# Altium PCB TimerDesign.PcbDoc
Units mm, origin at the board's own origin, x right, y up, seen from the top; angles counter-clockwise.
Board outline 152.4 x 101.6 mm, 2 copper layers (Top Layer, Bottom Layer); 29 components, 36 nets, 114 pads, 6 vias.
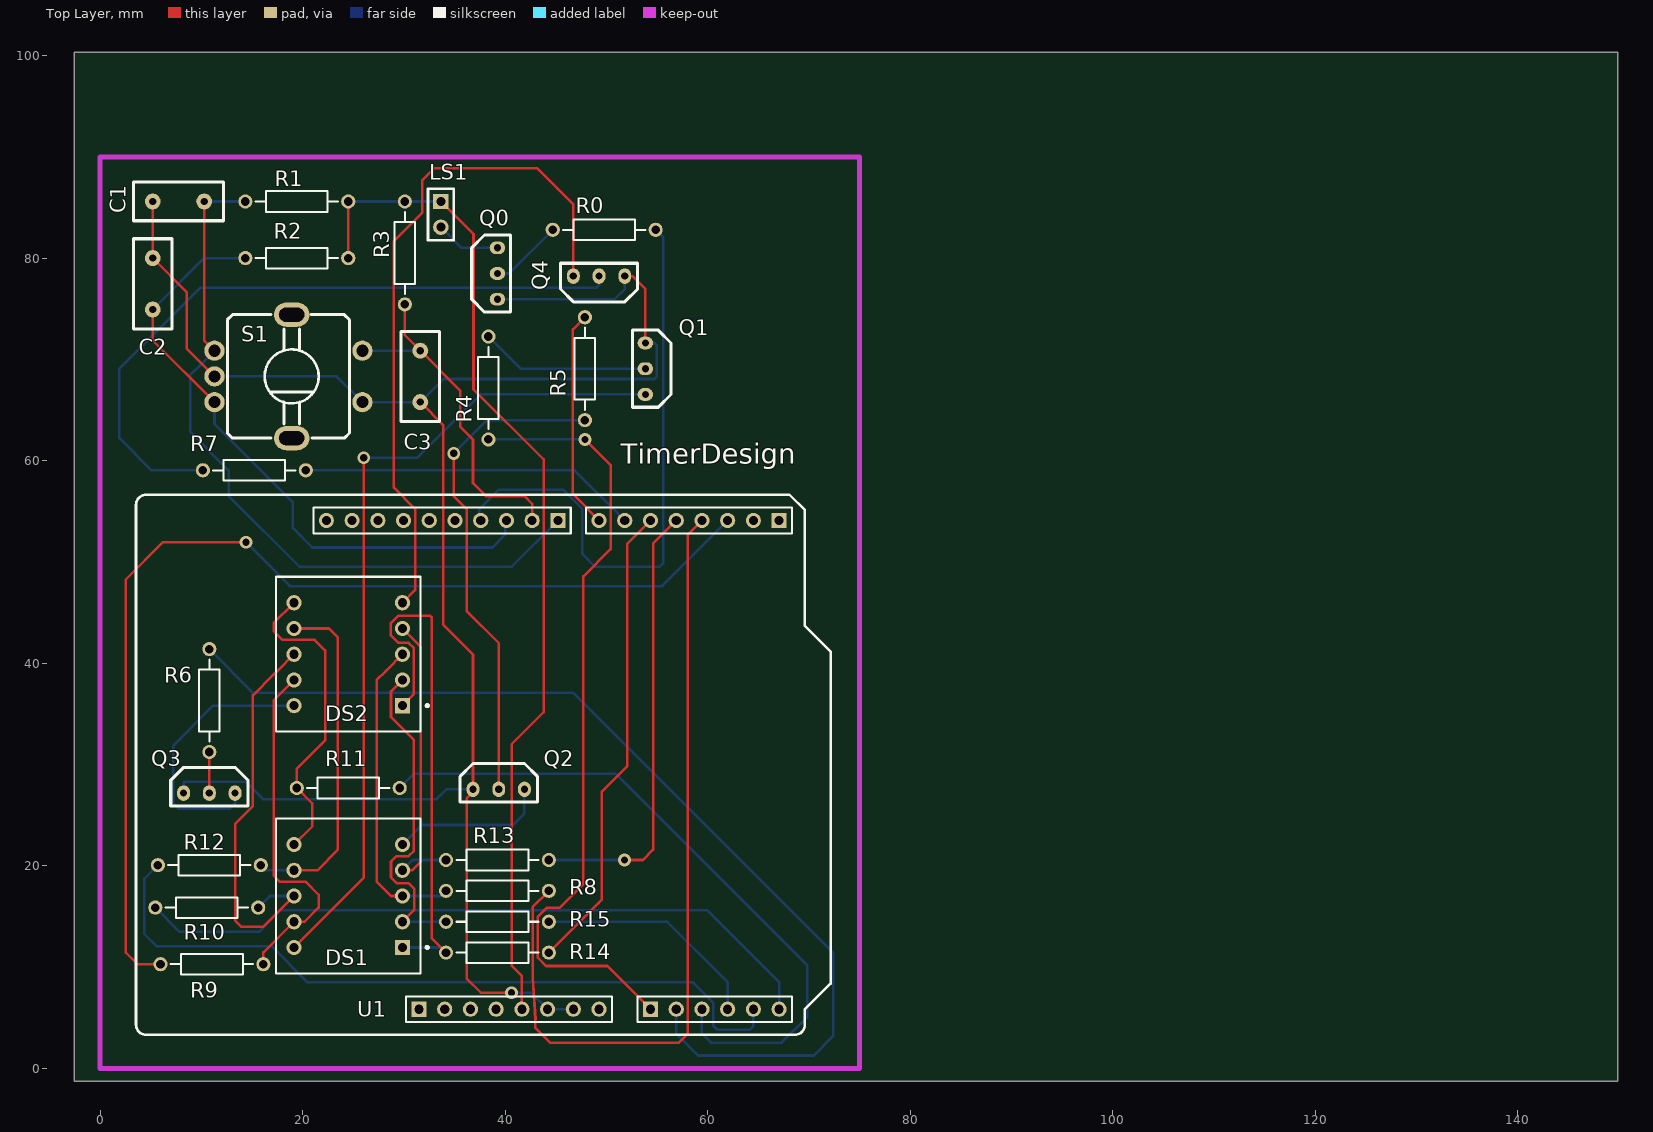
[diagram p0: Top Layer view]
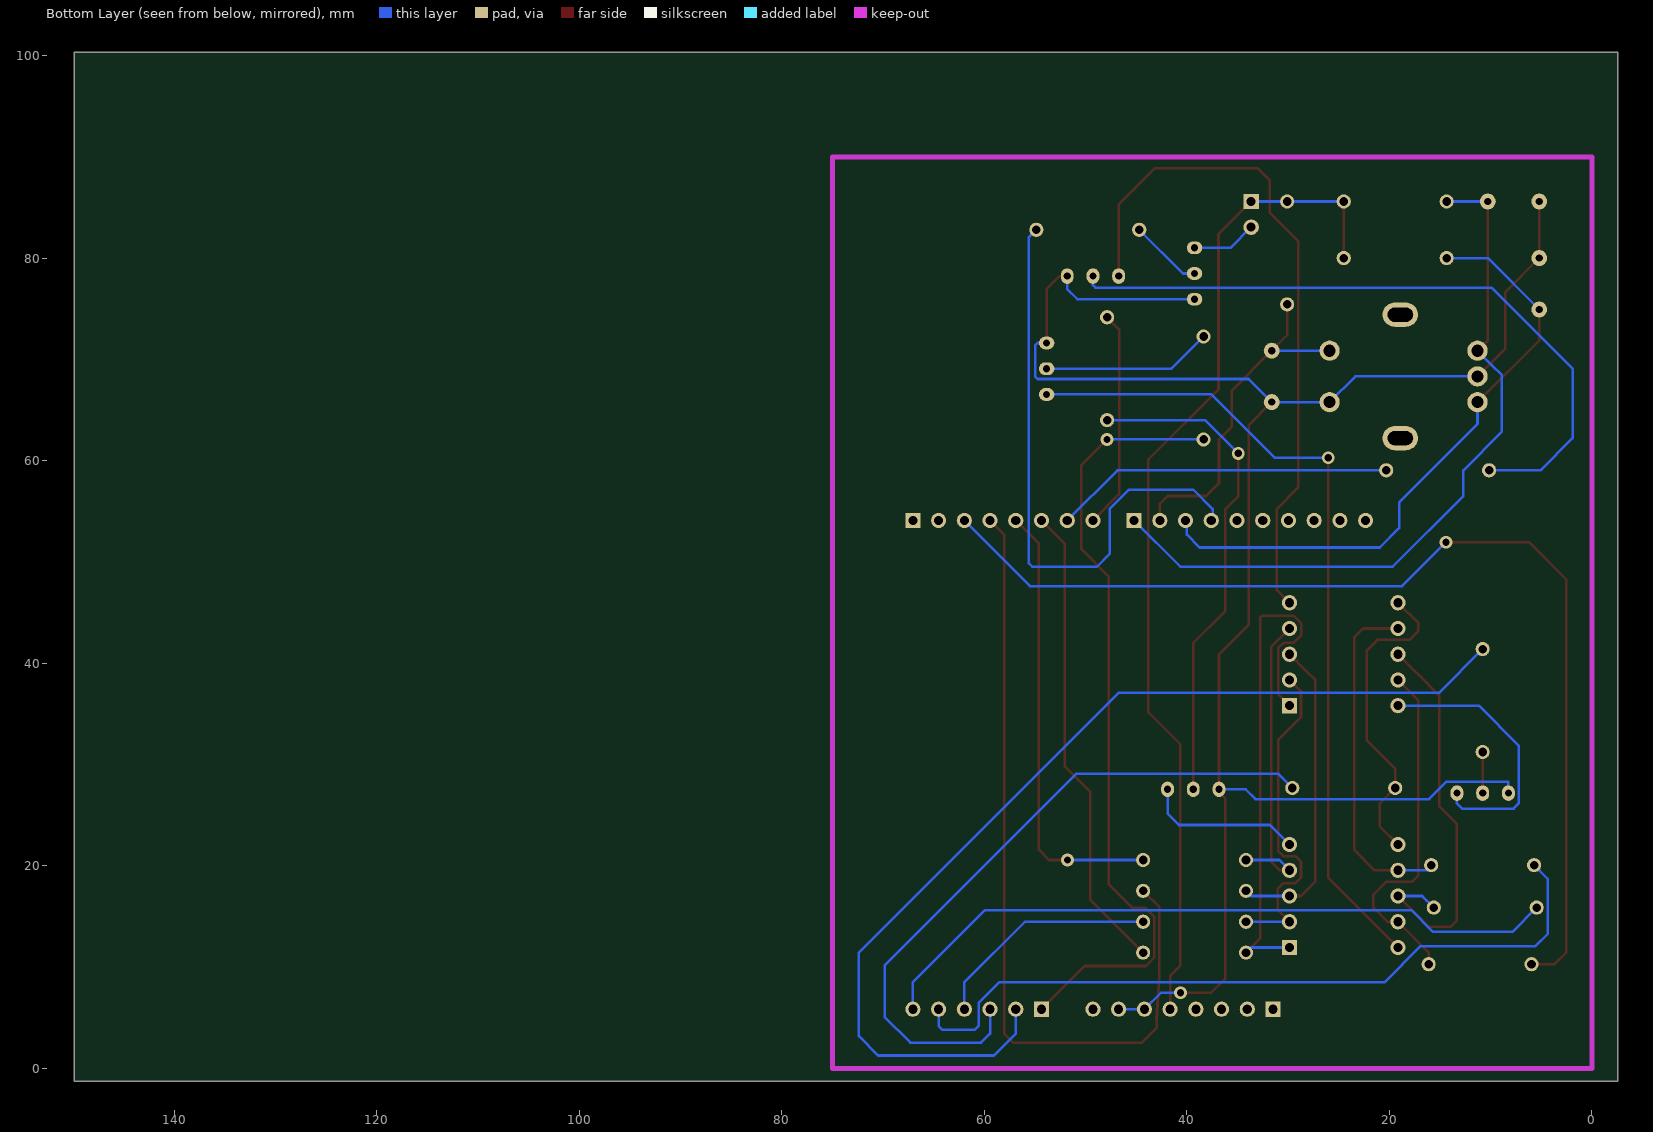
[diagram p1: Bottom Layer view, seen from below]

## Layer stack, top to bottom
Top Layer: signal copper 0.0356
Dielectric: dielectric 0.32, FR-4, Dk 4.8
Bottom Layer: signal copper 0.0356

## Board outline
-2.54,-1.27 149.86,-1.27 149.86,100.33 -2.54,100.33

## Design rules (kind name [scope] priority, off if disabled: settings)
Clearance [All] p1: gap=0.254
DiffPairsRouting [All] p1 off: maxlimit=0.254 minlimit=0.254 mostfreqgap=0.254 maxuncoupledlength=12.7
FanoutControl Fanout_BGA [IsBGA] p1 off: bgadir=Out bgaviamode=Centered fanoutstyle=Auto fanoutdirection=Alternating viagrid=0.025 // Fanout_BGA (Default Rule)
FanoutControl Fanout_LCC [IsLCC] p2 off: bgadir=Out bgaviamode=Centered fanoutstyle=Auto fanoutdirection=Alternating viagrid=0.025 // Fanout_LCC (Default Rule)
FanoutControl Fanout_SOIC [IsSOIC] p3 off: bgadir=Out bgaviamode=Centered fanoutstyle=Auto fanoutdirection=Alternating viagrid=0.025 // Fanout_SOIC (Default Rule)
FanoutControl Fanout_Small [(CompPinCount < 5)] p4 off: bgadir=Out bgaviamode=Centered fanoutstyle=Auto fanoutdirection=OutThenIn viagrid=0.025 // Fanout_Small (Default Rule)
FanoutControl Fanout_Default [All] p5 off: bgadir=Out bgaviamode=Centered fanoutstyle=Auto fanoutdirection=Alternating viagrid=0.025 // Fanout_Default (Default Rule)
HoleSize [All] p1 off: absolutevalues=TRUE maxlimit=2.54 minlimit=0.025 maxpercent=80.000 minpercent=20.000
HoleToHoleClearance [All] p1 off: gap=0.254 allowstackedmicrovias=TRUE
LayerPairs [All] p1 off: enforce=TRUE
MinimumSolderMaskSliver [All] p1 off: minsoldermaskwidth=0.254
NetAntennae [All] p1 off: netantennaetolerance=0
PolygonConnect [All] p1: connectstyle=Relief reliefconductorwidth=0.254 reliefentries=4 polygonreliefangle="90 Angle"
RoutingCorners [All] p1 off: cornerstyle=45-Degree minsetback=2.54 maxsetback=2.54
RoutingLayers [All] p1 off: top layer_v5=TRUE bottom layer_v5=TRUE
RoutingPriority [All] p1 off: routingpriority=0
RoutingTopology [All] p1 off: topology=Shortest
RoutingVias [All] p1 off: holewidth=0.711 width=1.27 viastyle="Through Hole" minholewidth=0.711 minwidth=1.27 maxholewidth=0.711 maxwidth=1.27
SilkscreenOverComponentPads [All] p1: minsilkscreentomaskgap=0.254
SolderMaskExpansion [All] p1: expansion=0.102
TestPointUsage [All] p1 off: valid=0 allowmultiple=FALSE
Testpoint [All] p1 off: side=15 testpointundercomponent=TRUE minsize=1.016 maxsize=2.54 preferedsize=1.524 minholesize=0 maxholesize=1.016 preferedholesize=0.813 testpointgrid=0.025 style=1023 order=0123456789
Width [All] p1: maxlimit=1.27 minlimit=0.254 preferedwidth=0.254
8 further rules are at their usual default settings.

## Components (designator, comment, footprint, x,y, rotation, side; value= is the part's Value field where it differs from the comment)
C1 "100nF" RAD0.2 10.287,85.598 r180 top
C2 "100nF" RAD0.2 5.207,74.93 r90 top
C3 "100nF" RAD0.2 31.623,70.866 r270 top
DS1 "Common Cathode 2-Digit LED" HDSM-577 24.511,17.018 r90 top
DS2 "Common Cathode 2-Digit LED" HDSM-577 24.511,40.894 r90 top
LS1 "Buzzer" SIP-2 33.655,85.598 r270 top
Q0 "NPN" NPN 39.243,75.946 r90 top
Q1 "NPN" NPN 53.848,71.628 r270 top
Q2 "NPN" NPN 36.83,27.559 r0 top
Q3 "NPN" NPN 8.255,27.178 r0 top
Q4 "NPN" NPN 51.816,78.232 r180 top
R0 "1K" AXIAL-0.4 49.784,82.804 r180 top
R1 "10K" AXIAL-0.4 19.431,85.598 r0 top
R2 "10K" AXIAL-0.4 19.431,80.01 r0 top
R3 "10K" AXIAL-0.4 30.099,80.518 r90 top
R4 "1K" AXIAL-0.4 38.354,67.183 r90 top
R5 "1K" AXIAL-0.4 47.879,69.088 r270 top
R6 "1K" AXIAL-0.4 10.795,36.322 r270 top
R7 "1K" AXIAL-0.4 15.24,59.055 r180 top
R8 "100" AXIAL-0.4 39.243,17.526 r180 top
R9 "100" AXIAL-0.4 11.049,10.287 r0 top
R10 "100" AXIAL-0.4 10.541,15.875 r0 top
R11 "100" AXIAL-0.4 24.511,27.686 r180 top
R12 "100" AXIAL-0.4 10.795,20.066 r0 top
R13 "100" AXIAL-0.4 39.243,20.574 r180 top
R14 "100" AXIAL-0.4 39.243,11.43 r180 top
R15 "100" AXIAL-0.4 39.243,14.478 r180 top
S1 "SW-EC11" EC11 18.923,68.326 r270 top
U1 "Arduino" Arduino-UNO-EX 45.212,29.972 r0 top

## Footprints (in the part's own frame and the unit in brackets; to place one, negate y for a bottom-side part, rotate by r counter-clockwise, add the part's x,y. Pads: shape width x height; smd on the part's side, far side on the other; paste and mask are expansions set on the pad)
Arduino-UNO-EX [mm]
  rect 1.5x1.5 hole 0.9: 1(21.844,24.13) 9(0,24.13) 19(-13.716,-24.13) 27(9.144,-24.13)
  round 1.5 hole 0.9: 2(19.304,24.13) 3(16.764,24.13) 4(14.224,24.13) 5(11.684,24.13) 6(9.144,24.13) 7(6.604,24.13) 8(4.064,24.13) 10(-2.54,24.13) 11(-5.08,24.13) 12(-7.62,24.13) 13(-10.16,24.13) 14(-12.7,24.13) 15(-15.24,24.13) 16(-17.78,24.13) 17(-20.32,24.13) 18(-22.86,24.13) 20(-11.176,-24.13) 21(-8.636,-24.13) 22(-6.096,-24.13) 23(-3.556,-24.13) 24(-1.016,-24.13) 25(1.524,-24.13) 26(4.064,-24.13) 28(11.684,-24.13) 29(14.224,-24.13) 30(16.764,-24.13) 31(19.304,-24.13) 32(21.844,-24.13)
  silkscreen extent -41.66,-26.67 26.92,26.67
AXIAL-0.4 [mm] "Resistor; 2 Leads"
  round 1.4 hole 0.85: 1(-5.08,0) 2(5.08,0)
  silkscreen extent -4.06,-1.02 4.06,1.02
EC11 [mm] "旋转编码器"
  round 2 hole 1.2: 1(-2.54,-7.62) 2(0,-7.62) 3(2.54,-7.62) 4(2.54,6.985) 5(-2.54,6.985)
  oval 2.4x3.5 hole 1.4 slot 2.5 at 90 deg: 6(-6.096,0) 7(6.096,0)
  silkscreen extent -6.1,-6.35 6.1,5.72
HDSM-577 [mm] "LED, 7-Segment Display, 9.2 mm, Dual Digit; 10 Leads; Row Space 10.7 mm; Pitch 2.54 mm"
  rect 1.5x1.5 hole 0.9: 1(-5.08,-5.35)
  round 1.5 hole 0.9: 2(-2.54,-5.35) 3(0,-5.35) 4(2.54,-5.35) 5(5.08,-5.35) 6(5.08,5.35) 7(2.54,5.35) 8(0,5.35) 9(-2.54,5.35) 10(-5.08,5.35)
  silkscreen extent -7.65,-7.93 7.65,7.15
NPN [mil]
  oval 50x60 hole 28: 1(0,0) 2(100,0) 3(200,0)
  silkscreen extent -50,-50 250,100
RAD0.2 [mil]
  round 62 hole 28: 1(0,0) 2(200,0)
  silkscreen extent -75,-75 275,75
SIP-2 [mil]
  rect 60x60 hole 35: 1(0,0)
  round 60 hole 35: 2(100,0)
  silkscreen extent -50,-50 150,50

## Part data
C1 C2 C3: library part Cap, "Capacitor"
DS1 DS2: library part HDSM-577G, "9.2 mm Green 7-Segment Display: 2-Digit, RH DP"
LS1: library part Bell, "Electrical Bell"
Q0 Q1 Q2 Q3 Q4: "NPN Bipolar Transistor"
R0 R1 R2 R3 R4 R5 R6 R7 R8 R9 R10 R11 R12 R13 R14 R15: library part Res2, "Resistor"
S1: "旋转编码开关"

## Via types
v1: diameter 1.27, hole 0.711, Top Layer to Bottom Layer, 6 vias

## Nets (pads, with @x,y where several pads share a name; then routed paths per layer and width w, separated by ;. In a path a pad name is that pad's centre, name@x,y a point inside that pad or via, vN(x,y) a via of type N, cw(c..) or ccw(c..) an arc to the next point about the centre after c; other vN are vias at no path point)
5V: LS1.1 R1.2 R2.2 R3.2 U1.23 | length 100.4
  Top Layer w0.254: R2.2 R1.2 ; LS1.1 36.881,82.372 36.881,67.056 43.815,60.122 43.815,35.179 40.64,32.004 40.64,26.035 40.64,10.16 41.656,9.144 U1.23
  Bottom Layer w0.254: R1.2 R3.2 LS1.1
D2: R9.1 U1.3 | length 106.2
  Top Layer w0.254: R9.1 3.683,10.287 2.54,11.43 2.54,48.26 6.235,51.955 v1(14.427,51.955)
  Bottom Layer w0.254: v1(14.427,51.955) 18.757,47.625 55.499,47.625 59.829,51.955 U1.3
D3: R8.1 U1.4 | length 81.7
  Top Layer w0.254: 42.986,5.058 42.986,4.004 44.45,2.54 45.288,2.54 57.15,2.54 58.039,3.429 58.039,4.826 58.039,52.705 U1.4 ; 43.002,4.826 42.723,8.941 42.723,15.926 R8.1
D4: R13.1 U1.5 | length 44.2
  Top Layer w0.254: v1(51.791,20.574) 53.594,20.574 54.61,21.59 54.61,51.816 U1.5
  Bottom Layer w0.254: R13.1 v1(51.791,20.574)
D5: R14.1 U1.6 | length 47
  Top Layer w0.254: R14.1 49.225,16.332 ; 49.101,16.208 49.53,16.637 49.53,27.305 52.07,29.845 52.07,51.816 U1.6
D6: R7.1 U1.7 | length 33.5
  Bottom Layer w0.254: R7.1 46.863,59.055 U1.7
D7: R5.1 U1.8 | length 21.6
  Top Layer w0.254: R5.1 46.685,72.974 46.685,56.693 U1.8
D8: C1.1 R1.1 S1.1 U1.9 | length 73.4
  Top Layer w0.254: C1.1 10.287,71.882 S1.1
  Bottom Layer w0.254: C1.1 R1.1 ; S1.1 9.906,69.469 8.89,68.453 8.89,62.865 12.7,59.055 12.7,56.515 19.685,49.53 40.64,49.53 U1.9
D9: C3.1 R3.1 S1.5 U1.10 | length 34.5
  Top Layer w0.254: R3.1 30.099,72.39 C3.1 35.56,66.929 35.56,63.368 36.83,62.098 36.83,57.785 38.1,56.515 41.91,56.515 42.672,55.753 U1.10
  Bottom Layer w0.254: S1.5 C3.1
D10: C2.1 R2.1 S1.3 U1.11 | length 62.3
  Top Layer w0.254: C2.1 5.207,71.882 S1.3
  Bottom Layer w0.254: C2.1 10.287,80.01 R2.1 ; S1.3 11.303,63.627 19.05,55.88 19.05,53.34 20.955,51.435 38.735,51.435 40.005,52.705 40.005,53.975 U1.11
D11: R0.1 U1.12 | length 59.3
  Bottom Layer w0.254: U1.12 37.465,54.229 37.465,55.245 39.37,57.15 45.72,57.15 47.625,55.245 47.625,50.8 48.895,49.53 52.07,49.53 55.245,49.53 55.626,49.911 55.626,53.594 55.626,82.042 R0.1
D14: R4.1 U1.27 | length 78.7
  Top Layer w0.254: v1(47.879,62.103) 50.419,59.563 50.419,51.283 47.727,48.59 47.727,18.186 45.415,15.875 44.12,15.875 43.231,14.986 43.231,10.922 44.044,10.109 50.089,10.109 U1.27
  Bottom Layer w0.254: R4.1 v1(47.879,62.103)
D15: R6.1 U1.28 | length 101.9
  Bottom Layer w0.254: R6.1 15.113,37.084 43.485,37.084 46.736,37.084 72.39,11.43 72.39,3.175 70.485,1.27 59.055,1.27 56.896,3.429 U1.28
D16: R11.1 U1.29 | length 68
  Bottom Layer w0.254: R11.1 31.013,29.108 49.251,29.108 50.902,29.108 69.85,10.16 69.85,5.08 67.31,2.54 60.325,2.54 59.436,3.429 U1.29
D17: R15.1 U1.30 | length 22.8
  Bottom Layer w0.254: R15.1 53.34,14.478 56.007,14.478 61.976,8.509 U1.30
D18: R12.1 U1.31 | length 74.5
  Bottom Layer w0.254: R12.1 4.369,18.72 4.369,13.284 5.588,12.065 16.942,12.065 20.51,8.497 58.534,8.497 60.567,6.464 60.567,4.203 60.96,3.81 64.135,3.81 64.516,4.191 U1.31
D19: R10.1 U1.32 | length 69.1
  Bottom Layer w0.254: R10.1 7.849,13.487 15.697,13.487 17.831,15.621 57.277,15.621 59.944,15.621 67.056,8.509 U1.32
GND: C1.2 C2.2 C3.2 Q0.1 Q1.1 Q2.1 Q3.1 Q4.1 S1.2 S1.4 U1.24 U1.25 | length 194
  Top Layer w0.254: C1.2 C2.2 8.56,76.657 8.56,71.069 S1.2 ; C3.2 33.909,63.5 33.909,43.79 36.83,40.869 Q2.1 36.83,27.305 36.195,26.67 36.195,11.913 36.195,8.89 37.617,7.468 v1(40.64,7.468) ; Q4.1 52.578,78.232 53.848,76.962 Q1.1
  Bottom Layer w0.254: Q3.1 8.255,28.321 14.351,28.321 16.078,26.594 33.223,26.594 34.188,27.559 Q2.1 ; S1.2 23.368,68.326 S1.4 C3.2 33.909,68.072 54.737,68.072 54.991,68.326 54.991,71.374 54.737,71.628 Q1.1 ; Q0.1 50.8,75.946 51.816,76.962 Q4.1 ; v1(40.64,7.468) 42.57,7.468 U1.24 U1.25
NetDS1_1: DS1.1 DS2.1 R14.2 | length 52.7
  Top Layer w0.254: DS2.1 30.992,36.945 30.992,41.513 30.48,42.025 29.464,42.025 28.727,42.762 28.727,43.967 29.464,44.704 32.563,44.704 32.741,44.526 32.741,12.852 R14.2
  Bottom Layer w0.254: DS1.1 33.655,11.938 R14.2
NetDS1_2: DS1.2 DS2.2 R15.2 | length 33.4
  Top Layer w0.254: DS1.2 31.013,15.63 31.013,17.755 30.48,18.288 29.286,18.288 28.73,18.844 28.73,20.424 29.261,20.955 30.48,20.955 30.992,21.467 30.992,32.421 28.73,34.683 28.73,37.223 DS2.2
  Bottom Layer w0.254: DS1.2 R15.2
NetDS1_3: DS1.3 DS2.3 R8.2 | length 31.2
  Top Layer w0.254: DS1.3 28.73,17.018 27.333,18.415 27.305,18.415 27.305,38.338 28.222,39.255 DS2.3
  Bottom Layer w0.254: DS1.3 33.655,17.018 R8.2
NetDS1_4: DS1.4 DS2.4 R13.2 | length 30.7
  Top Layer w0.254: DS1.4 30.816,19.558 31.688,20.43 31.688,41.607 DS2.4
  Bottom Layer w0.254: DS1.4 30.877,20.574 R13.2
NetDS1_5: DS1.5 Q2.3 | length 15.7
  Bottom Layer w0.254: DS1.5 31.791,24.028 40.792,24.028 41.91,25.146 Q2.3
NetDS1_6: DS1.6 DS2.6 R11.2 | length 31.2
  Top Layer w0.254: DS1.6 20.955,23.892 20.955,26.162 R11.2 19.431,29.591 22.225,32.385 22.225,41.275 21.197,42.303 18.022,42.303 17.145,43.18 17.145,43.958 DS2.6
NetDS1_7: DS1.7 DS2.7 R12.2 | length 34.7
  Top Layer w0.254: DS1.7 21.463,19.558 23.495,21.59 23.495,39.1 ; DS2.7 22.606,43.434 23.495,42.545 23.495,38.735
  Bottom Layer w0.254: R12.2 16.383,19.558 DS1.7
NetDS1_8: DS1.8 DS2.8 R10.2 | length 40.1
  Top Layer w0.254: DS1.8 16.113,13.97 13.97,13.97 13.335,14.605 13.335,24.13 15.097,25.892 15.097,36.83 17.145,38.878 17.522,39.255 DS2.8
  Bottom Layer w0.254: R10.2 16.764,17.018 DS1.8
NetDS1_9: DS1.9 DS2.9 R9.2 | length 35.1
  Top Layer w0.254: R9.2 16.129,11.446 DS1.9 20.193,14.478 21.59,15.875 21.59,17.145 20.32,18.415 17.78,18.415 17.145,19.05 17.145,36.338 18.03,37.223 DS2.9
NetDS1_10: DS1.10 Q1.3 | length 81.6
  Top Layer w0.254: DS1.10 26.035,18.812 v1(26.035,60.3)
  Bottom Layer w0.254: v1(26.035,60.3) 31.344,60.3 37.592,66.548 Q1.3
NetDS2_5: DS2.5 Q4.3 | length 68.3
  Top Layer w0.254: DS2.5 31.115,47.228 31.115,55.245 29.007,57.353 29.007,81.686 31.826,84.506 31.826,86.131 31.826,87.706 33.02,88.9 43.129,88.9 45.212,86.817 46.736,85.293 Q4.3
NetDS2_10: DS2.10 Q3.3 | length 26.8
  Bottom Layer w0.254: Q3.3 13.335,26.162 12.827,25.654 7.747,25.654 7.239,26.162 7.239,31.877 11.176,35.814 DS2.10
NetLS1_2: LS1.2 Q0.3 | length 6.4
  Bottom Layer w0.254: LS1.2 35.687,81.026 Q0.3
NetQ0_2: Q0.2 R0.2 | length 7.2
  Bottom Layer w0.254: Q0.2 40.386,78.486 R0.2
NetQ1_2: Q1.2 R4.2 | length 16.8
  Bottom Layer w0.254: R4.2 41.529,69.088 Q1.2
NetQ2_2: Q2.2 R5.2 | length 49.3
  Top Layer w0.254: v1(34.925,60.731) 34.925,56.515 36.195,55.245 36.195,45.161 39.37,41.986 Q2.2
  Bottom Layer w0.254: v1(34.925,60.731) 38.202,64.008 R5.2
NetQ3_2: Q3.2 R6.2 | length 4.1
  Top Layer w0.254: Q3.2 R6.2
NetQ4_2: Q4.2 R7.2 | length 68.1
  Bottom Layer w0.254: R7.2 5.08,59.055 1.905,62.23 1.905,69.088 9.906,77.089 14.224,77.089 49.022,77.089 49.276,77.343 Q4.2
pads on no net: S1.6 S1.7 U1.1 U1.2 U1.13 U1.14 U1.15 U1.16 U1.17 U1.18 U1.19 U1.20 U1.21 U1.22 U1.26

## Keep-outs
Keep-Out Layer:
  lines w0.508: 0,0 0,90 75,90 75,0 0,0

## Silkscreen, mask and mechanical layers (free items; w line width, h text height)
Top Overlay:
  text "TimerDesign" at 51.435,59.69 h2